# Altium PCB BMS042A_PCB.PcbDoc (part 2 of 5)
Units mil, origin at the board's own origin, x right, y up, seen from the top; angles counter-clockwise.
Board outline 4409.45 x 3307 mil, 6 copper layers (Top Layer, Layer 2 - PGND, Layer 3, Layer 4, Layer 5 - PGND, Bottom Layer), stack 60.8 mil thick; 273 components, 77 nets, 544 pads, 927 vias.
Unrouted connection lines stored in the file: 219.
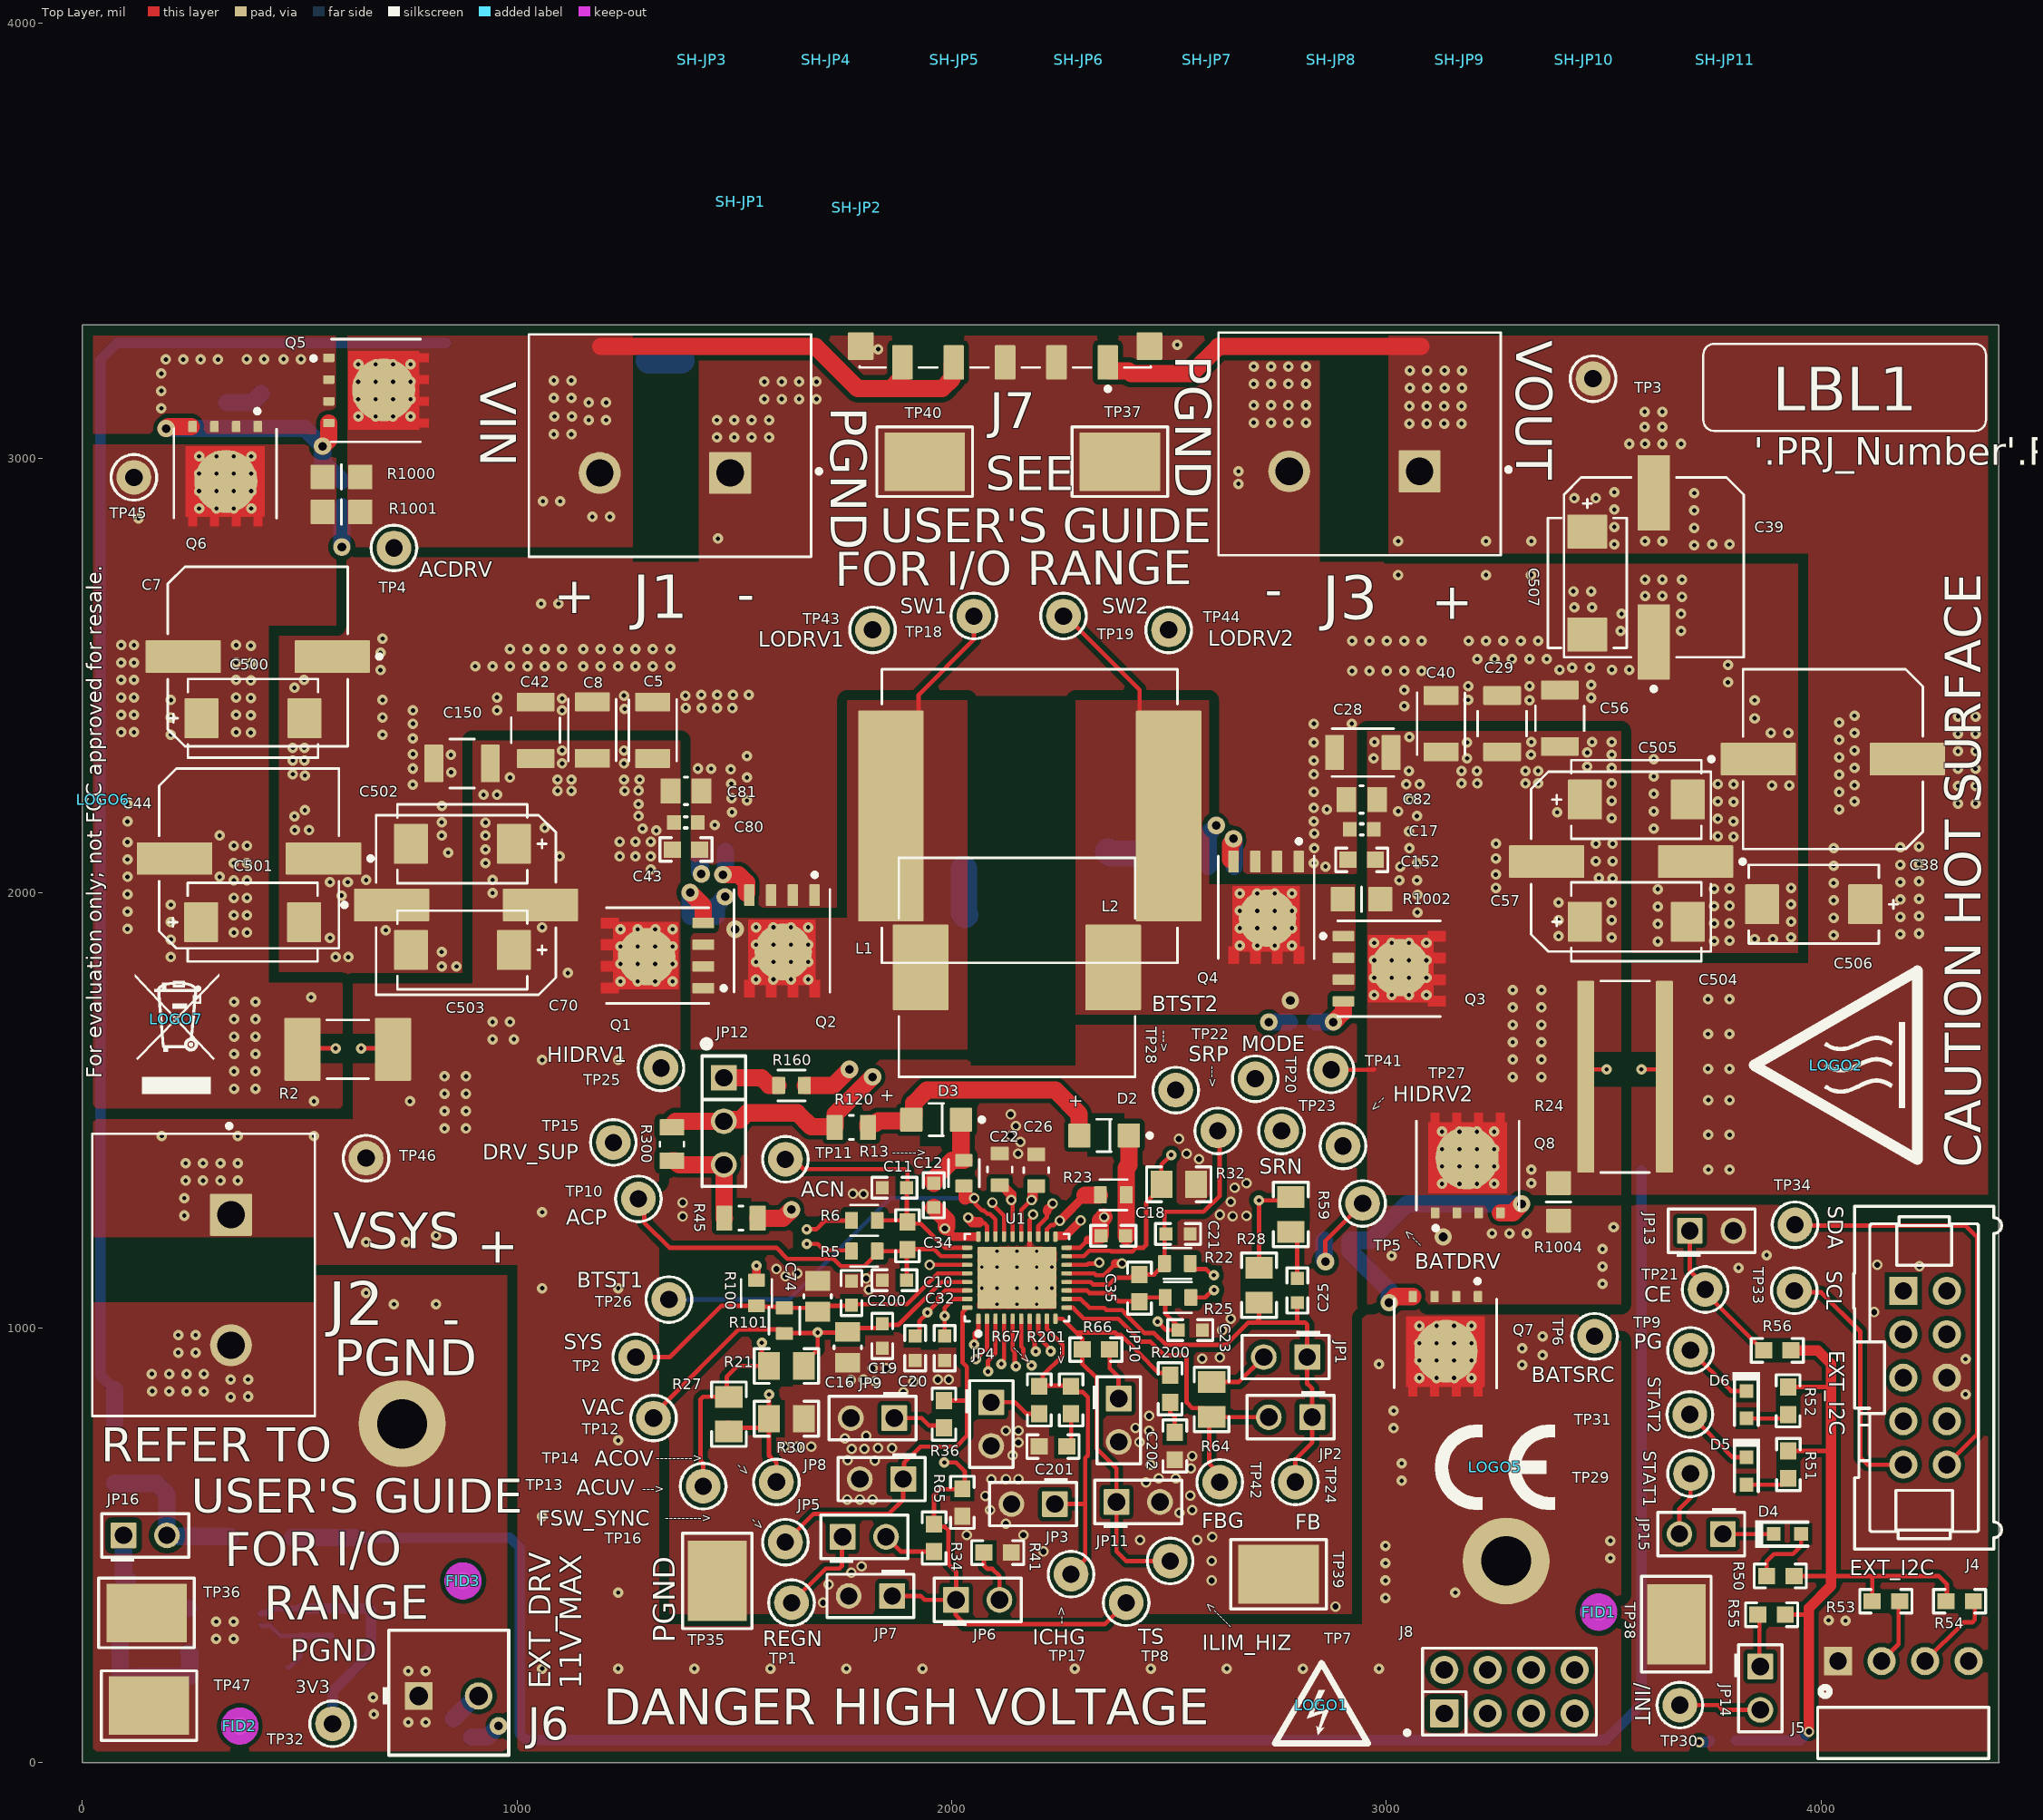
[diagram p0: Top Layer view]

## Part data (continued)
C22 C26: library part CMP-0093626-1, "Cap Ceramic 4.7uF 25V X7R 10% Pad SMD 0805 +125°C Automotive T/R", Manufacturer="TDK Corporation", Operating Temperature Range="-55°C to +125°C", TempCo=15%, Temperature Characteristic=X7R, Tolerance_%=0.1%, ValueDisplayed=4.7uF, AEC Grade="Grade 1", AEC Qualified=Yes, Cap_F=4.7µF, ComponentLink1Description=Datasheet, ComponentLink1URL=https://product.tdk.com/info/en/catalog/datasheets/mlcc_automotive_soft_en.pdf, datasheet=https://product.tdk.com/info/en/catalog/datasheets/mlcc_automotive_soft_en.pdf, Datasheet Path=datasheets/Cap-CGA4J1X7R1E475K125AE.pdf, helpURL=https://upverter.com/upn/revision/748290ea9605f801/, Lead Free=Yes, PackageReference=0805, Part Number=CGA4J1X7R1E475K125AE, PartNumber=CGA4J1X7R1E475K125AE, RoHS=TRUE, SizeZ_mm=1.45mm, VDC_V=25V
C25: library part CMP-0007130-4, "CAP, CERM, 100 pF, 100 V, +/- 5%, C0G/NP0, AEC-Q200 Grade 1, 0603", Cap_Case=0603, Manufacturer=MuRata, Supplier Part Number 1=490-4771-1-ND, TempCo=C0G/NP0, Tolerance_%=5%, Value1=Unknown, Value2=100V, ValueDisplayed=100pF, AEC Category=Q200, AEC Grade=1, AEC Qualified=Y, Cap_F=100pF, ComponentLink1Description="Datasheet link", ComponentLink1URL=http://psearch.murata.com/capacitor/product/GCM1885C2A101JA16%23.pdf, CompType=Capacitor, LatestRevisionDate=2017-03-09, MountType=SMT, PackageReference=0603, PartNumber=GCM1885C2A101JA16D, Polarized=N, Published=2008-06-19, Publisher="Texas Instruments", RoHS=Y, SizeArea_mm2=1.28, SizeAreaWB_mm2=4.68, SizeX_mm=1.6, SizeY_mm=0.8, SizeZ_mm=1, Supplier 1=Digi-Key, Supplier 2=Mouser, Supplier Part Number 2=81-GCM1885C2A101JA6D, TaMax_C=125°C, TaMin_C=-55°C, Technology=Ceramic, U/M=EA, VDC_V=100V
C31 C151: library part CMP-0007081-4, "Multilayer Ceramic Capacitors MLCC - SMD/SMT CGA 0603 100V 1000pF X7R 10% AEC-Q200", Cap_Case=0603, Manufacturer=TDK, Supplier Part Number 1=445-5806-1-ND, TempCo=X7R, Tolerance_%=10%, Value1="1.97137 ohm", Value2=100V, ValueDisplayed=1000pF, AEC Category=Q200, AEC Grade=1, AEC Qualified=Y, Cap_F=1nF, ComponentLink1Description="Datasheet link", ComponentLink1URL=https://product.tdk.com/en/search/capacitor/ceramic/mlcc/info?part_no=CGA3E2X7R2A102K080AA, CompType=Capacitor, ESR_ohm=1.9714, IRMS_A=305.705mA, LatestRevisionDate=2017-03-09, MountType=SMT, PackageReference=0603, PartNumber=CGA3E2X7R2A102K080AA, Polarized=N, Published=2008-06-19, Publisher="Texas Instruments", RoHS=Y, SizeArea_mm2=1.28, SizeAreaWB_mm2=4.68, SizeX_mm=1.6, SizeY_mm=0.8, SizeZ_mm=1, Supplier 1=Digi-Key, Supplier 2=Mouser, Supplier Part Number 2=810-CGA3E2X7R2A102K080AA, TaMax_C=125°C, TaMin_C=-55°C, Technology=Ceramic, U/M=EA, VDC_V=100V
C33 C49: library part CMP-0093624-1, "General Purpose Ceramic Capacitor, 1210, 1uF, 10%, X7R, 15%, 100V", Manufacturer=AVX, Operating Temperature Range="-55°C to +125°C", TempCo=15%, Temperature Characteristic=X7R, Tolerance_%=10%, ValueDisplayed=1uF, AEC Qualified=No, Cap_F=1µF, ComponentLink1Description=Datasheet, ComponentLink1URL=https://spicat.avx.com/product/mlcc/chartview/12101C105KAT2A, datasheet=https://spicat.avx.com/product/mlcc/chartview/12101C105KAT2A, Datasheet Path=datasheets/Cap-12101C105KAT2A.pdf, helpURL=https://upverter.com/upn/revision/f45417cd630ceee2/, Lead Free=Yes, PackageReference=1210, Part Number=12101C105KAT2A, PartNumber=12101C105KAT2A, RoHS=TRUE, SizeZ_mm=2.79mm, VDC_V=100V
C34 C35: library part CMP-0006944-4, "CAP, CERM, 0.47 uF, 16 V, +/- 10%, X7R, 0603", Cap_Case=0603, Manufacturer=Kemet, Supplier Part Number 1=399-4922-1-ND, TempCo=X7R, Tolerance_%=10%, Value1=Unknown, Value2=16V, ValueDisplayed=0.47uF, AEC Category=Q200, AEC Qualified=?, Cap_F=470nF, ComponentLink1Description="Datasheet link", ComponentLink1URL=http://www.kemet.com/kemet/web/homepage/kechome.nsf/vapubfiles/F3102_Y5V.pdf/$file/F3102_Y5V.pdf, CompType=Capacitor, LatestRevisionDate=2017-03-09, MountType=SMT, PackageReference=0603, PartNumber=C0603C474K4RACTU, Polarized=N, Published=2008-06-19, Publisher="Texas Instruments", RoHS=Y, SizeArea_mm2=1.28, SizeAreaWB_mm2=4.68, SizeX_mm=1.6, SizeY_mm=0.8, SizeZ_mm=1, Supplier 1=Digi-Key, Supplier 2=Mouser, Supplier 3=Farnell, Supplier Part Number 2=80-C0603C474K4R, Supplier Part Number 3=1414644, TaMax_C=125°C, TaMin_C=-55°C, Technology=Ceramic, U/M=EA, VDC_V=16V
C43 C152: library part CMP-0007237-3, "Multilayer Ceramic Capacitors MLCC - SMD/SMT CGA 0603 100V 100pF C0G 5% AEC-Q200", Cap_Case=0603, Manufacturer=TDK, Supplier Part Number 1=490-1351-1-ND, TempCo=C0G/NP0, Tolerance_%=5%, Value1=Unknown, Value2=100V, ValueDisplayed=100pF, AEC Category=Q200, AEC Qualified=?, Cap_F=100pF, ComponentLink1Description="Datasheet link", ComponentLink1URL=http://search.murata.co.jp/Ceramy/PnsearchViewAction.do?HnOFG=ON&HnNFG=ON&SEL_CNT=50&sLang=en&sKey=GRM1885C2A101JA01D&x=9&y=9&search=startwith, CompType=Capacitor, LatestRevisionDate=2017-03-09, MountType=SMT, PackageReference=0603, PartNumber=CGA3E2C0G2A101J080AA, Polarized=N, Published=2008-06-19, Publisher="Texas Instruments", RoHS=Y, SizeArea_mm2=1.28, SizeAreaWB_mm2=4.68, SizeX_mm=1.6, SizeY_mm=0.8, SizeZ_mm=1, Supplier 1=Digi-Key, Supplier 2=Mouser, Supplier 3=Farnell, Supplier Part Number 2=CGA3E2C0G2A101J080AA, Supplier Part Number 3=1828919, TaMax_C=125°C, TaMin_C=-55°C, Technology=Ceramic, U/M=EA, VDC_V=100V
C48: library part CMP-0007728-2, "CAP, CERM, 1 uF, 25 V, +/- 10%, X7R, 0805", Cap_Case=0805, Manufacturer=Kemet, Supplier Part Number 1=399-8004-1-ND, TempCo=X7R, Tolerance_%=10%, Value1=Unknown, Value2=25V, ValueDisplayed=1uF, AEC Category=Q200, AEC Qualified=?, Cap_F=1µF, ComponentLink1Description="Datasheet link", ComponentLink1URL=http://capacitoredge.kemet.com/capedge2/DataSheet/Datasheet-C0805C105K3RACTU.pdf?pn=C0805C105K3RACTU, CompType=Capacitor, LatestRevisionDate=2017-03-09, MountType=SMT, PackageReference=0805, PartNumber=C0805C105K3RACTU, Polarized=N, Published=2008-06-19, Publisher="Texas Instruments", RoHS=Y, SizeArea_mm2=2.5, SizeAreaWB_mm2=6.75, SizeX_mm=2, SizeY_mm=1.25, SizeZ_mm=1.45, Supplier 1=Digi-Key, Supplier 2=Newark, Supplier 3=Mouser, Supplier Part Number 2=93K6001, Supplier Part Number 3=80-C0805C105K3R, TaMax_C=125°C, TaMin_C=-55°C, Technology=Ceramic, U/M=EA, VDC_V=25V
C50: library part CMP-0006895-4, "CAP, CERM, 220 pF, 50 V, +/- 10%, X7R, 0603", Cap_Case=0603, Manufacturer=Kemet, Supplier Part Number 1=399-1071-1-ND, TempCo=X7R, Tolerance_%=10%, Value1=Unknown, Value2=50V, ValueDisplayed=220pF, AEC Category=Q200, AEC Qualified=?, Cap_F=220pF, ComponentLink1Description="Datasheet link", ComponentLink1URL=http://www.kemet.com/kemet/web/homepage/kechome.nsf/vapubfiles/F3102_Y5V.pdf/$file/F3102_Y5V.pdf, CompType=Capacitor, LatestRevisionDate=2017-03-09, MountType=SMT, PackageReference=0603, PartNumber=C0603C221K5RACTU, Polarized=N, Published=2008-06-19, Publisher="Texas Instruments", RoHS=Y, SizeArea_mm2=1.28, SizeAreaWB_mm2=4.68, SizeX_mm=1.6, SizeY_mm=0.8, SizeZ_mm=1, Supplier 1=Digi-Key, Supplier 2=Mouser, Supplier 3=Farnell, Supplier Part Number 2=80-C0603C221K5R, Supplier Part Number 3=1650844, TaMax_C=125°C, TaMin_C=-55°C, Technology=Ceramic, U/M=EA, VDC_V=50V
C201 C202: library part CMP-0006862-5, "CAP, CERM, 0.1 uF, 10 V, +/- 10%, X7R, 0603", Cap_Case=0603, Manufacturer=Kemet, Supplier Part Number 1=399-1095-1-ND, TempCo=X7R, Tolerance_%=10%, Value1=Unknown, Value2=10V, ValueDisplayed=0.1uF, AEC Category=Q200, AEC Qualified=?, Cap_F=100nF, ComponentLink1Description="Datasheet link", ComponentLink1URL=http://www.kemet.com/kemet/web/homepage/kechome.nsf/vapubfiles/F3102_Y5V.pdf/$file/F3102_Y5V.pdf, CompType=Capacitor, LatestRevisionDate=2017-03-09, MountType=SMT, PackageReference=0603, PartNumber=C0603C104K8RACTU, Polarized=N, Published=2008-06-19, Publisher="Texas Instruments", RoHS=Y, SizeArea_mm2=1.28, SizeAreaWB_mm2=4.68, SizeX_mm=1.6, SizeY_mm=0.8, SizeZ_mm=1, Supplier 1=Digi-Key, Supplier 2=Mouser, Supplier 3=Farnell, Supplier Part Number 2=80-C0603C104K8R, Supplier Part Number 3=1640032, TaMax_C=125°C, TaMin_C=-55°C, Technology=Ceramic, U/M=EA, VDC_V=10V
C500 C501 C502 C503 C504 C505 C506 C507 C508 C509 C510 C511 C512 C513 C514 C515 C516 C517 C518 C519: library part CMP-0096796-1, "Cap Tant Polymer 15uF 75VDC X CASE 20% (7.3 X 4.3 X 4mm) SMD 7343-43 0.035 Ohm 125C T/R", Digikey Part Number=399-13123-1-ND, Leakage Current=112.5uA, Manufacturer=KEMET, Mouser Part Number=80-T521X156M75ATE35, Operating Temperature Range="-55°C to +125°C", Tolerance_%=20%, ValueDisplayed=15uF, AEC Qualified=No, Cap_F=15µF, ComponentLink1Description=Datasheet, ComponentLink1URL=https://connect.kemet.com:7667/gateway/IntelliData-ComponentDocumentation/1.0/download/datasheet/T521X156M075ATE035.pdf, datasheet=https://connect.kemet.com:7667/gateway/IntelliData-ComponentDocumentation/1.0/download/datasheet/T521X156M075ATE035.pdf, Datasheet Path=datasheets/Cap-T521X156M075ATE035.pdf, Digikey Description="CAP TANT POLY 15UF 75V 2917", Dissipation Factor=10%, Esr=35m, helpURL=https://upverter.com/upn/revision/90f8c1535eb156fb/, IRMS_A=3.38A, Lead Free=Yes, Life=2000Hours, PackageReference=2917, Part Number=T521X156M075ATE035, PartNumber=T521X156M075ATE035, RoHS=TRUE, SizeZ_mm=4.3mm, Standoff Height=0mm, Supplier 1=Digikey, Supplier 2=Mouser, Supplier Part Number 1=399-13123-1-ND, Supplier Part Number 2=80-T521X156M75ATE35, VDC_V=75V
D1: library part CMP-0093134-1, "Zener Diode Single 15V 5% 30Ohm 300mW Automotive 3-Pin SOT-23 T/R", Digikey Part Number=SZBZX84C15LT3GOSCT-ND, Manufacturer="On Semiconductor", Max Reverse Leakage Current=0.05uA, Mouser Part Number=863-SZBZX84C15LT3G, Operating Temperature Range="-65°C to +150°C", Power_W=250mW, AEC Grade="Grade 0", AEC Qualified=Yes, Ciiva Ids=807354, ComponentLink1Description=Datasheet, ComponentLink1URL=https://www.onsemi.com/pdf/datasheet/bzx84c2v4lt1-d.pdf, datasheet=https://www.onsemi.com/pdf/datasheet/bzx84c2v4lt1-d.pdf, Datasheet Path=datasheets/Diode-SZBZX84C15LT3G.pdf, Digikey Description="DIODE ZENER 15V 250MW SOT23-3", helpURL=https://upverter.com/upn/revision/6f6a125b7e8a6255/, Import Ts=1521856680, Lead Free=Yes, Mouser Description="Zener Diodes ZEN REG .225W 15V", PackageReference=SOT23, Part Number=SZBZX84C15LT3G, PartNumber=SZBZX84C15LT3G, Release Date=1407151217, RoHS=TRUE, SizeZ_mm=1.11mm, Standoff Height=0.01mm, Tjmax_C=+150°C, Vault Guid=74793917-17ED-4331-99DE-1B396C15B43A, Vr_V=10.5V, VRWM=15.6V, Vz_V=15V, Zener Impedance=30Ω
D2 D3: library part CMP-0093639-2, "Diode Schottky 1A Surface Mount DO-219AB (SMF)", Digikey Part Number=112-V1FM10-M3/HCT-ND, Forward Current=1A, Manufacturer=Vishay, Max Surge Forward Current=30A, Mouser Part Number=78-V1FM10-M3/H, Operating Temperature Range="-40°C to +175°C", Peak Reverse Current=0.2uA, ValueDisplayed=95pF, AEC Category=Q101, AEC Qualified=No, Cap_F=95pF, ComponentLink1Description=Datasheet, ComponentLink1URL=https://www.vishay.com/docs/87557/v1fm10.pdf, CompType=Diode, datasheet=https://www.vishay.com/docs/87557/v1fm10.pdf, Datasheet Path=datasheets/Diode-V1FM10-M3-H.pdf, Digikey Description="1A 100V SMF TRENCH SKY RECT", helpURL=https://upverter.com/upn/revision/746fedbc755f5789/, Lead Free=Yes, Mouser Description="Rectifier Diode Schottky 100V 1A 2-Pin SMF T/R", PackageReference=DO-219AB, Part Number=V1FM10-M3/H, PartNumber=V1FM10-M3/H, RoHS=TRUE, SizeZ_mm=1.08mm, Standoff Height=0mm, Tjmax_C=175°C, Vf_V=100V, Vr_V=100V
D4 D5 D6: library part CMP-0002894-2, "LED, Green, SMD", Color=green, Manufacturer="Wurth Elektronik", Value1=W, Value2=2V, ComponentLink1Description="Datasheet link", ComponentLink1URL=http://katalog.we-online.de/led/datasheet/150060VS75000.pdf, CompType=LED, Io_A=20mA, MountType=SMT, PackageReference=LED_0603, PartNumber=150060VS75000, RoHS=Y, Type=AlInGaP, Vf_V=2V
D7 D8: library part CMP-0028821-2, "Diode, Schottky, 100 V, 12 A, AEC-Q101, TO-277A", Manufacturer="Fairchild Semiconductor", Value1=12A, Value2=0.67V, AEC Category=Q101, AEC Qualified=Y, ComponentLink1Description="Datasheet link", ComponentLink1URL=https://www.fairchildsemi.com/datasheets/FS/FSV12100V.pdf, CompType=Diode, Green_EU RoHS=Incomplete, Green_EU RoHS-2=Incomplete, Green_Lifecycle="Not Set", Green_REACh=Incomplete, Io_A=12A, MountType=SMT, PackageReference=TO-277A, PartNumber=FSV12100V, RoHS=Y, SizeArea_mm2=30.875, SizeAreaWB_mm2=57.375, SizeX_mm=6.5, SizeY_mm=4.75, SizeZ_mm=1.2, Tjmax_C=150°C, Type=Schottky, Vf_V=670mV, Vr_V=100V
D9 D10: library part CMP-0096827-2, "Diode Standard 100 V 1A Surface Mount DO-214AC (SMA)", Digikey Part Number=VS-1EMH01HM3/5AT-ND, Forward Current=1A, Manufacturer=Vishay, Max Surge Forward Current=50A, Mouser Part Number=78-VS-1EMH01HM35AT, Operating Temperature Range="-55°C to +175°C", Peak Reverse Current=2uA, ValueDisplayed=8.5pF, AEC Category=Q101, AEC Grade="Grade 0", AEC Qualified=Yes, Cap_F=8.5pF, ComponentLink1Description=Datasheet, ComponentLink1URL=https://www.vishay.com/docs/95827/vs-1emh01hm3.pdf, CompType=Diode, datasheet=https://www.vishay.com/docs/95827/vs-1emh01hm3.pdf, Datasheet Path=datasheets/Diode-VS-1EMH01HM3_5AT.pdf, Digikey Description="DIODE GEN PURP 100V 1A SMA", helpURL=https://upverter.com/upn/revision/9996868a21b16944/, Lead Free=Yes, PackageReference=DO-214AC, Part Number=VS-1EMH01HM3/5AT, PartNumber=VS-1EMH01HM3/5AT, RoHS=TRUE, SizeZ_mm=2.29mm, Standoff Height=0mm, Tjmax_C=175°C, Vf_V=100V, Vr_V=100V
FID1 FID2 FID3 FID4 FID5 FID6: library part CMP-0077181-1, "Fiducial mark.  There is nothing to buy or mount.", Manufacturer=N/A, ClassName=FiducialMark, CompType=Fiducial, MountType=N/A, PackageReference=N/A, PartNumber=N/A
H1 H2 H3 H4: library part CMP-0003620-1, "Bumpon, Hemisphere, 0.44 X 0.20, Clear", Manufacturer=3M, Supplier Part Number 1=SJ5303-7-ND, ComponentLink1Description="Datasheet Link", ComponentLink1URL=http://multimedia.mmm.com/mws/mediawebserver.dyn?6666660Zjcf6lVs6EVs666cIsCOrrrrQ-, CompType=Bumpon, Key="SJ-5303 (CLEAR)", LatestRevisionDate=2017-03-09, MountType=N/A, PackageReference="Transparent Bumpon", PartNumber="SJ-5303 (CLEAR)", Publisher="Texas Instruments", RoHS=Y, Supplier 1=Digi-Key, Supplier 2=Newark, Supplier 3=Mouser, Supplier Part Number 2=23M7326, Supplier Part Number 3=517-SJ-5303CL
J1 J2 J3: library part CMP-0093294-2, Current_A=30A, Digikey Part Number=102-6189-ND, Manufacturer="CUI Devices", Mouser Part Number=490-TB005-762-02BE, Operating Temperature Range="-40°C to +105°C", Voltage_V=300V, AEC Qualified=No, ComponentLink1Description=Datasheet, ComponentLink1URL=https://www.cuidevices.com/product/resource/tb005-762.pdf, Conn Gender=Female, Conn Orientation=Horizontal, ContactFinish=Tin, datasheet=https://www.cuidevices.com/product/resource/tb005-762.pdf, Datasheet Path=datasheets/Conn-TB005-762-02BE.pdf, Digikey Description="TERMINAL BLOCK, SCREW TYPE, 7.62", DUT-Pitch_mm=7.62mm, helpURL=https://upverter.com/upn/revision/970266f4e9060307/, Is Female=yes, Lead Free=Yes, Max Wire Gauge=10, Min Wire Gauge=26, Mouser Description="2 poles, CUI Blue, slotted screw, Terminal block, screw type, 7.62 , horizontal", PackageReference=TERM_CONN, Part Number=TB005-762-02BE, PartNumber=TB005-762-02BE, PinCount=2, RoHS=TRUE, Row_Count=1, SizeZ_mm=22.1mm, Supplier 1=Digikey, Supplier 2=Mouser, Supplier Part Number 1=102-6189-ND, Supplier Part Number 2=490-TB005-762-02BE
J4: library part CMP-0055448-2, "Header (shrouded), 100mil, 5x2, High-Temperature, Gold, TH", Manufacturer=3M, Supplier Part Number 1=MHC10K-ND, ComponentLink1Description="Datasheet URL", ComponentLink1URL=http://multimedia.3m.com/mws/mediawebserver?mwsId=66666UF6EVsSyXTtMXM6MxfcEVtQEVs6EVs6EVs6E666666--&fn=ts0770.pdf, CompType=Header, Green_EU RoHS=Passed, Green_EU RoHS-2=Incomplete, Green_Lifecycle=Active, Green_REACh=Passed, MountType=TH, PackageReference="5x2 Shrouded header", PartNumber=N2510-6002-RB, RoHS=Y, Supplier 1=Digi-Key, Supplier 2=Newark, Supplier 3=Mouser, Supplier Part Number 2=18M6808, Supplier Part Number 3=517-N2510-6002RB
J5: library part CMP-0055187-1, "Header (friction lock), 100mil, 4x1, R/A, TH", Manufacturer=Molex, Supplier Part Number 1=WM4302-ND, CNHeader=FALSE, ComponentLink1Description="Datasheet URL", ComponentLink1URL=http://www.molex.com/pdm_docs/sd/022053041_sd.pdf, CompType=Header, CT=FALSE, Green_EU RoHS=Passed, Green_EU RoHS-2=Passed, Green_Lifecycle=Active, Green_REACh=Passed, LatestRevisionDate=26/05/2017, MountType=TH, PackageReference="4x1 R/A Header", PartNumber=0022053041, Publisher="Texas Instruments", RoHS=Y, Supplier 1=Digi-Key, Supplier 2=Newark, Supplier 3=Mouser, Supplier Part Number 2=27C1932, Supplier Part Number 3=538-22-05-3041
J6: library part CMP-0055341-2, "Terminal Block, 3.5 mm, 2x1, Tin, TH", Manufacturer=Molex, Supplier Part Number 1=WM7877-ND, CNHeader=FALSE, ComponentLink1Description="Datasheet URL", ComponentLink1URL=http://www.molex.com/pdm_docs/sd/393570002_sd.pdf, CompType="Terminal Block", CT=TRUE, Green_EU RoHS=Incomplete, Green_EU RoHS-2=Incomplete, Green_Lifecycle="Not Set", Green_REACh=Incomplete, LatestRevisionDate=26/05/2017, MountType=TH, PackageReference="Terminal Block, 3.5 mm, 2x1, TH", PartNumber=0393570002, Publisher="Texas Instruments", RoHS=Y, Supplier 1=Digi-Key, Supplier 2=Newark, Supplier 3=Mouser, Supplier Part Number 2=72K2104, Supplier Part Number 3=538-39357-0002